# Altium PCB MainBoardPCB_PWR.PcbDoc (part 26 of 29)
Units mm, origin at the board's own origin, x right, y up, seen from the top; angles counter-clockwise.
Board outline 333.63 x 349.38 mm, 16 copper layers (L1, L2 (GND), L3 (Sign), L4 (GND), L5 (Sign), L6 (PWR/GND), L7(PWR/GND), L8 (PWR/GND), L9 (PWR/GND), L10 (PWR/GND), L11 (PWR/GND), L12 (Sign), L13 (GND), L14 (Sign), L15 (GND), L16), stack 2.503 mm thick; 2187 components, 1615 nets, 7987 pads, 1695 vias.
Unrouted connection lines stored in the file: 4757.
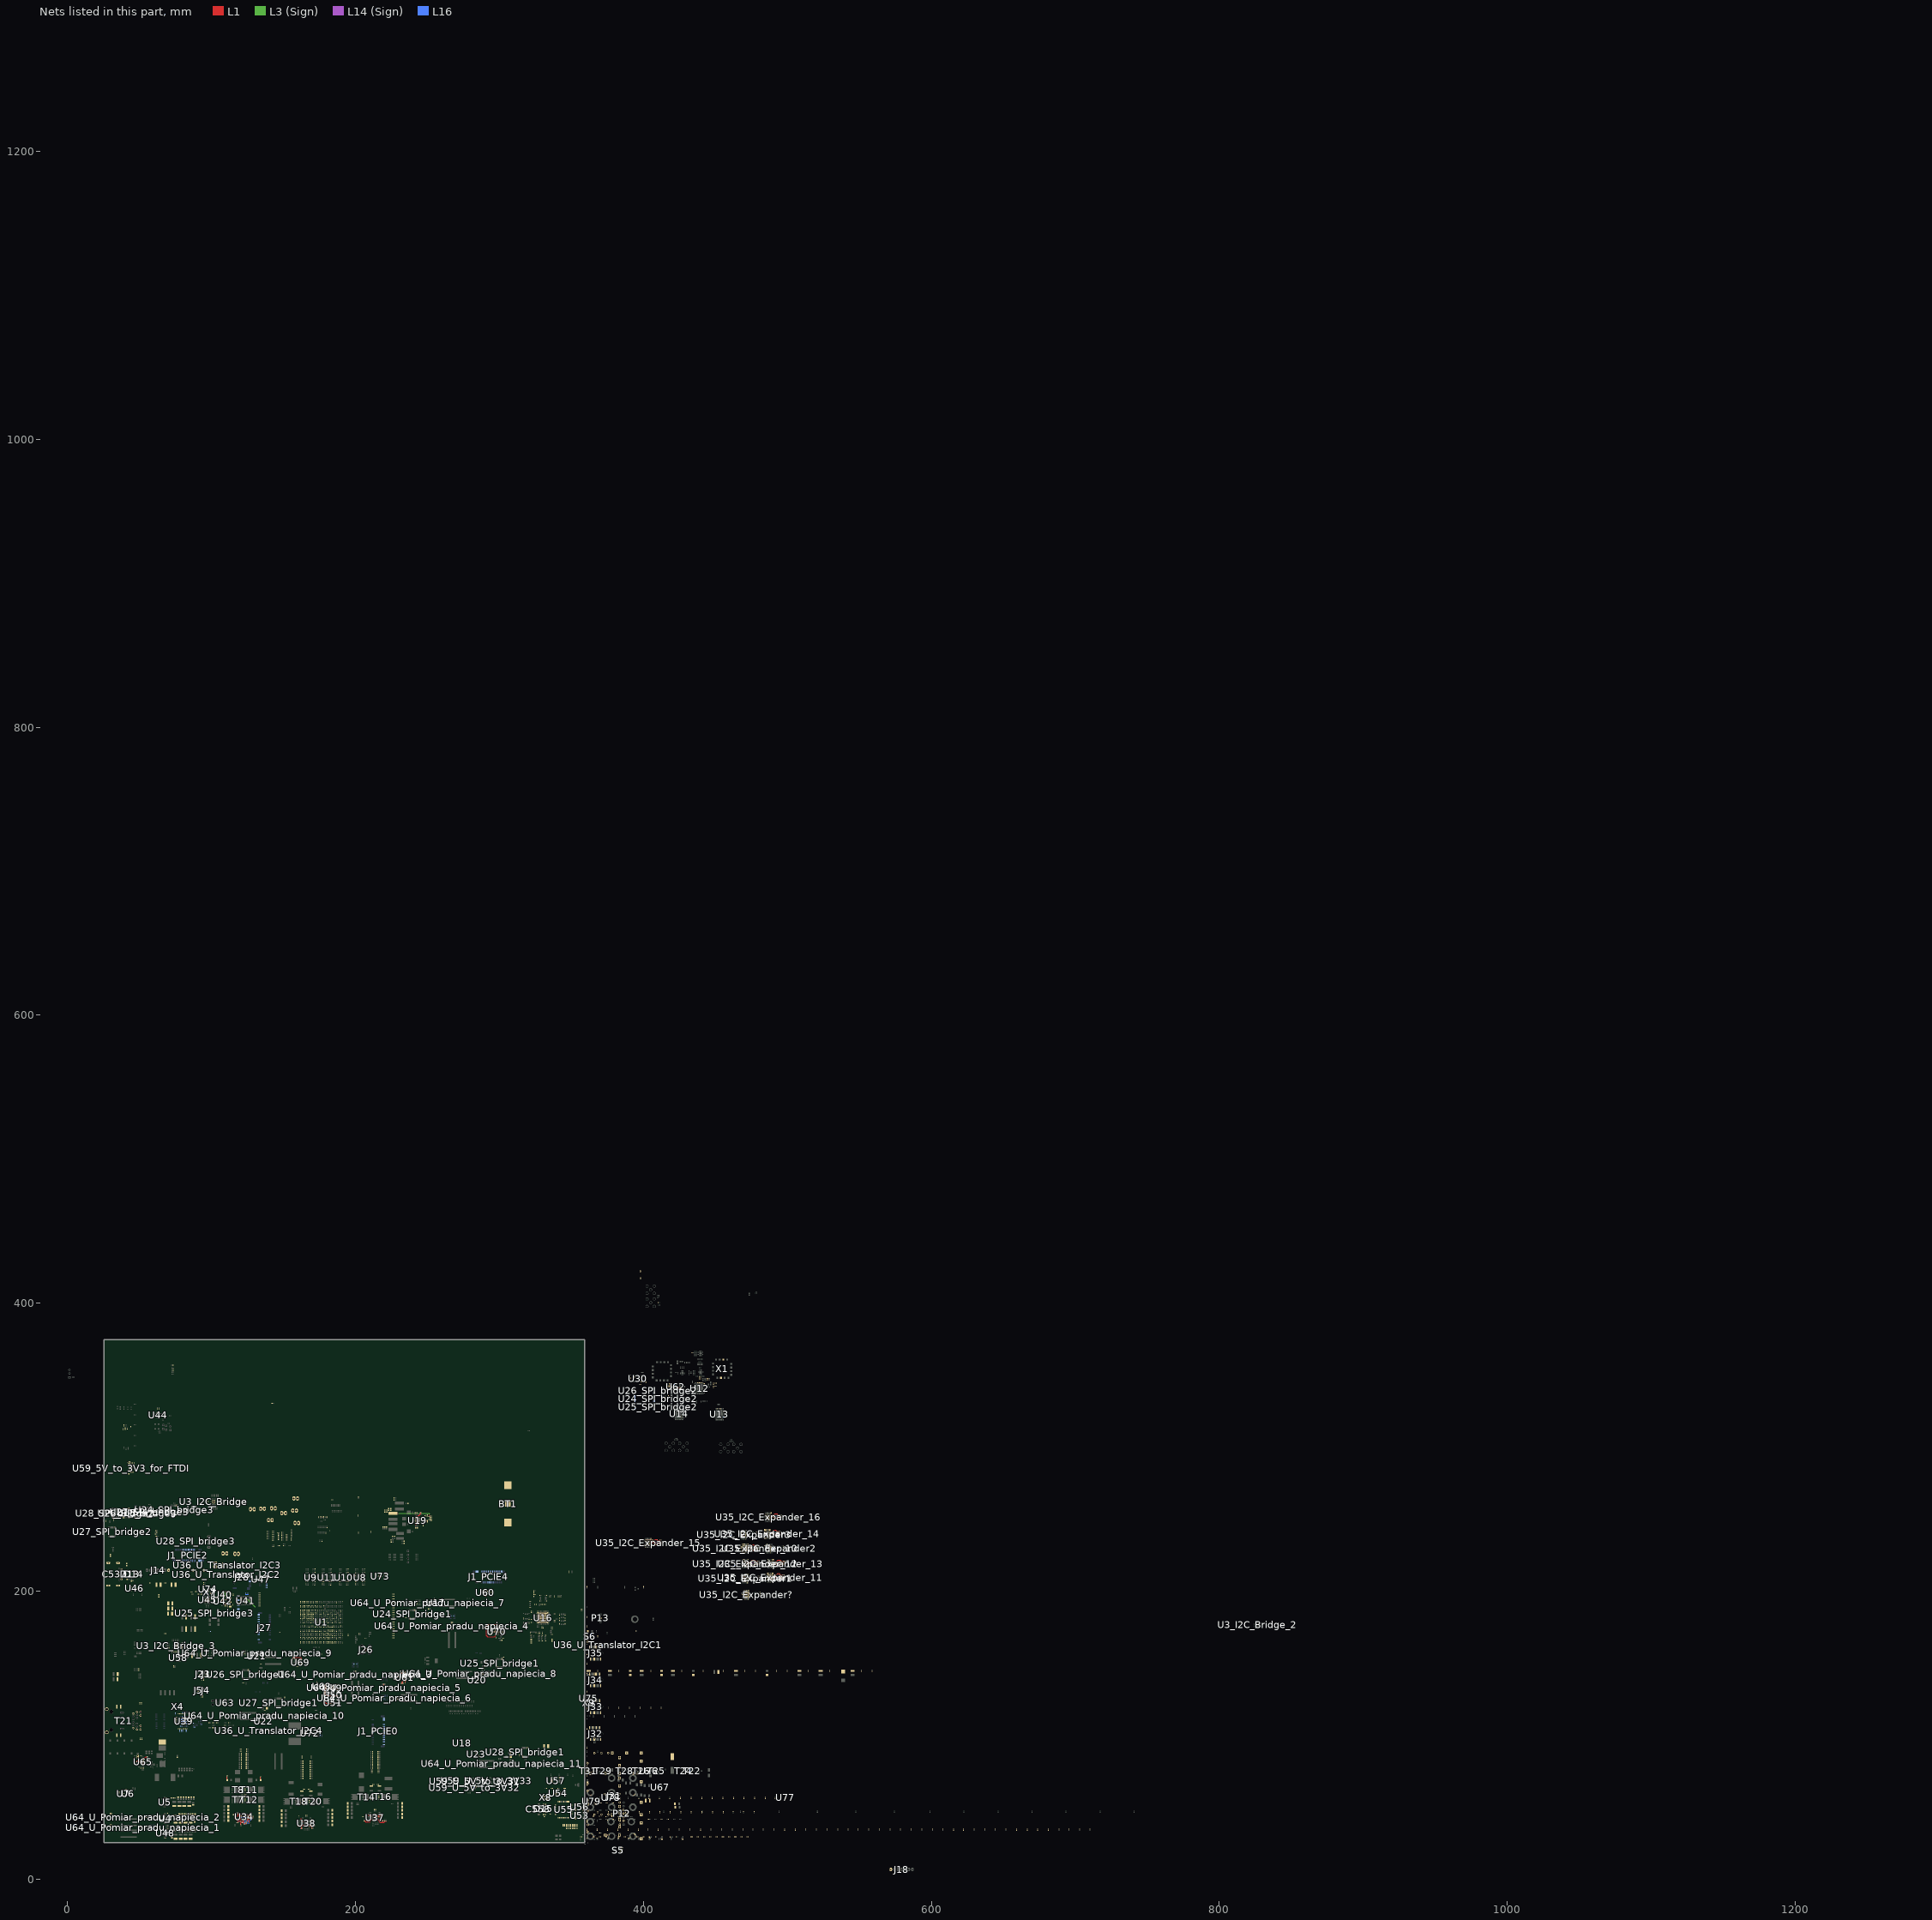
[diagram p21: the nets of this part, all layers, seen from the top]

## Via types
v1: diameter 0.5, hole 0.2, L1 to L16, 786 vias
v2: diameter 0.5/0.35/0.35/0.35/0.35/0.35/0.35/0.35/0.35/0.35/0.35/0.35/0.35/0.35/0.35/0.5 (per signal layer), hole 0.15, L1 to L16, tented both sides, 164 vias
v3: diameter 2.54, hole 1.02, L1 to L16, 152 vias
v4: diameter 0.5/0.35/0.35/0.35/0.35/0.35/0.35/0.35/0.35/0.35/0.35/0.35/0.35/0.35/0.35/0.5 (per signal layer), hole 0.2, L1 to L16, tented both sides, 100 vias
v5: diameter 0.45, hole 0.15, L1 to L16, 79 vias
v6: diameter 0.35/0/0.35 (per signal layer), hole 0.127, L1 to L3 (Sign), tented both sides, 78 vias
v7: diameter 0.45/0.45/0.45/0.45/0.45/0.45/0.45/0.45/0.45/0.45/0.45/0.45/0.45/0.45/0.45/0.45 (per signal layer), hole 0.15, L1 to L16, 65 vias
v8: diameter 0.4, hole 0.15, L1 to L16, 61 vias
v9: diameter 0.2, hole 0.1, L1 to L16, 35 vias
v10: diameter 0.5, hole 0.2, L1 to L16, tented both sides, 32 vias
v11: diameter 0.2/0/0.2 (per signal layer), hole 0.1, L1 to L3 (Sign), 28 vias
v12: diameter 0.4, hole 0.2, L1 to L16, 16 vias
v13: diameter 0.25, hole 0.2, L1 to L16, 16 vias
v14: diameter 0.3, hole 0.2, L1 to L16, 15 vias
v15: diameter 0.5/0.35/0.35/0.35/0.35/0.35/0.35/0.35/0.35/0.35/0.35/0.35/0.35/0.35/0.35/0.45 (per signal layer), hole 0.15, L1 to L16, tented both sides, 10 vias
v16: diameter 5, hole 3, L1 to L16, 9 vias
v17: diameter 0.2/0/0.2 (per signal layer), hole 0.1, L1 to L3 (Sign), tented both sides, 9 vias
v18: diameter 0.35/0/0.35 (per signal layer), hole 0.127, L1 to L3 (Sign), 7 vias
v19: diameter 0.35/0/0.35 (per signal layer), hole 0.127, L14 (Sign) to L16, tented both sides, 5 vias
v20: diameter 1.65, hole 1.65, L1 to L16, 4 vias
v21: diameter 1.15, hole 1.15, L1 to L16, 4 vias
v22: diameter 0.35, hole 0.127, L1 to L2 (GND), 2 vias
v23: diameter 0.4, hole 0.2, L1 to L16, tented both sides, 2 vias
v24: diameter 0.35, hole 0.127, L1 to L2 (GND), tented both sides, 2 vias
v25: diameter 0.508, hole 0.127, L1 to L2 (GND), 2 vias
v26: diameter 0.508, hole 0.127, L2 (GND) to L3 (Sign), 2 vias
v27: diameter 0.35, hole 0.127, L3 (Sign) to L6 (PWR/GND), tented both sides, 2 vias
v28: diameter 0.5, hole 0.2, L3 (Sign) to L6 (PWR/GND), tented both sides, 2 vias
v29: diameter 5.5, hole 3.5, L1 to L16, 1 vias
v30: diameter 0.45/0.45/0.45 (per signal layer), hole 0.15, L1 to L3 (Sign), 1 vias
v31: diameter 0.35/0.35/0.35 (per signal layer), hole 0.127, L1 to L3 (Sign), tented both sides, 1 vias
v32: diameter 0.45/0/0.45 (per signal layer), hole 0.15, L1 to L3 (Sign), tented both sides, 1 vias
v33: diameter 0.45/0/0.45 (per signal layer), hole 0.2, L14 (Sign) to L16, tented both sides, 1 vias
v34: diameter 0.35, hole 0.127, L2 (GND) to L3 (Sign), 1 vias

## Nets (pads, with @x,y where several pads share a name; then routed paths per layer and width w, separated by ;. In a path a pad name is that pad's centre, name@x,y a point inside that pad or via, vN(x,y) a via of type N, cw(c..) or ccw(c..) an arc to the next point about the centre after c; other vN are vias at no path point) (continued)
eMMC_GND: B1.2 BT1.1 C4.2 C5.2 C6.2 C7.2 C8.1 C9.1 C10.1 C11.1 C12.2 C13.2 C14.2 C15.2 C16.1 C17.1 C18.1 C19.1 C20.1 C21.1 C22.1 C23.1 C24.1 C25.1 C26.1 C27.1 C28.1 C29.1 C30.1 C31.1 C32.1 C33.1 C34.1 C35.1 C37.1 C38.2 C39.1 C40.2 C207.1 C208.2 C209.1 C210.2 C211.1 C212.2 C213.1 C214.2 C215.1 C216.2 C217.1 C218.2 C219.2 C220.2 C221.2 C222.2 C223.1 C224.1 C225.1 C226.1 C227.1 C228.1 C229.1 C230.1 C231.1 C232.1 C233.1 C234.1 C235.1 C236.1 C237.1 C238.1 C239.1 C240.1 C241.1 C242.1 C243.2 C244.2 C245.2 C246.2 C247.1 C248.1 C249.1 C250.1 C251.1 C252.1 C253.1 C254.1 C255.1 C256.1 C257.1 C258.1 C259.1 C260.1 C261.1 C262.1 C263.1 C264.1 C265.1 C266.1 C303_I2C_Bridge.1 C303_I2C_Bridge_2.1 C303_I2C_Bridge_3.1 C304.2 C305.2 C306.2 C307.2 C308.1 C309_U_Pomiar_pradu_napiecia_1.1 C309_U_Pomiar_pradu_napiecia_2.1 C309_U_Pomiar_pradu_napiecia_3.1 C309_U_Pomiar_pradu_napiecia_4.1 C309_U_Pomiar_pradu_napiecia_5.1 C309_U_Pomiar_pradu_napiecia_6.1 C309_U_Pomiar_pradu_napiecia_7.1 C309_U_Pomiar_pradu_napiecia_8.1 C309_U_Pomiar_pradu_napiecia_9.1 C309_U_Pomiar_pradu_napiecia_10.1 C309_U_Pomiar_pradu_napiecia_11.1 C310.1 C311_I2C_Expander1.1 C311_I2C_Expander2.1 C311_I2C_Expander3.1 C311_I2C_Expander?.1 C311_I2C_Expander_10.1 C311_I2C_Expander_11.1 C311_I2C_Expander_12.1 C311_I2C_Expander_13.1 C311_I2C_Expander_14.1 C311_I2C_Expander_15.1 C311_I2C_Expander_16.1 C331.1 C332.1 C347.1 C348.1 C352.1 C353.1 C354.1 C355.1 C358.1 C359.1 C360.1 C361.1 C362.1 C363.1 C364.1 C365.1 C366.1 C367.1 C368.1 C369.1 C370.1 C371.1 C372.1 C373.1 C374.1 C375.1 C376.1 C377.1 C378.1 C379.1 C380.1 C381.1 C382.1 C383.1 C384.1 C385.1 C386.1 C387.1 C388.1 C391.2 C392.1 C396.1 C397.2 C399.2 C400.1 C401.1 C402.1 C403.1 C404.1 C405.1 C406.1 C407.1 C408.1 C409.1 C410.1 C411.1 C412.1 C413.1 C414.1 C415.1 C416.1 C417.1 C418.1 C419.1 C420.1 C421.1 C422.1 C423.1 C424.1 C425.1 C426.1 C427.1 C428.1 C429.1 C432.2 C433.1 C437.1 C438.2 C440.2 C441.1 C442.1 C443.1 C444.1 C445.1 C446.1 C447.1 C448.1 C449.1 C450.1 C451.1 C452.1 C453.1 C454.1 C455.1 C456.1 C457.1 C458.1 C459.1 C460.1 C461.1 C462.1 C463.1 C464.1 C465.1 C466.1 C467.1 C468.1 C469.1 C470.1 C471.1 C472.1 C473.1 C474.1 C475.1 C476.1 C480.1 C481.1 C485.1 C486.1 C487.1 C488.1 C489.1 C490.1 C491.1 C492.1 C493.1 C494.1 C495.1 C496.1 C497.1 C498.1 C499.1 C500.1 C501.1 C502.1 C503.1 C504.1 C505.1 C506.1 C507.1 C508.1 C509.1 C510.1 C511.1 C512.1 C513.1 C514.1 C515.1 C516.1 C517.1 C518.1 C519.1 C520.1 C521.1 C522.1 C523.1 C524.1 C537.7 C538.1 C539.1 C544.1 C545.1 C546.1 C547.1 C550.1 C551.1 C552.1 C553.1 C554.1 C555.1 C561.1 C562.1 C585.1 C586.1 C587.1 C606.1 C607.1 C609.1 C610.1 C611.1 C613.1 C614.1 C615.1 C617.1 C618.1 C619.1 C620.1 C621.1 C622.1 C623.1 C624.1 C625.1 C626.1 C631.1 C632.1 C633.1 C636.1 C637.1 C638.1 C645.1 C646.1 C654.1 C655.2 C656.2 C657.2 C672.1 C674.1 C675.1 C676.1 C678.1 C679.1 C680.1 C705.1 C707.1 C708.1 C709.1 C711.1 C712.1 C719.1 C720.1 C721.1 C722.1 C723.1 C728.1 C729.1 C730.1 C731.1 C732.1 C733.1 C734.1 C735.1 C736.1 C737.1 C738.2 C739.2 C740.1 C741.1 C742.2 C743.1 C744.1 C745.1 C746.1 C747.2 C748.1 C749.1 C750.1 C751.2 C752.1 C753.2 C754.1 C755.1 C756.1 C757.2 C758.1 C759.1 C760.2 C761.1 C762.2 C763.1 C764.2 C765.1 C766.2 C767.2 C768.2 C769.2 C770.1 C771.1 C772.1 C773.1 C774.1 C775.1 C776.1 C777.1 C778.1 C779.1 C780.1 C781.1 C782.1 C783.1 C784.1 C785.1 C786.1 C787.1 C788.1 C789.1 C792.1 D13.3 D14.3 D14.8 D15.3 FB27.1 FB28.2 FB29.1 FB35.1 FB36.1 FB39.1 FB41.1 J14.1 J15.1 J16.1 J17.1 J18.1 J19.1 J20.1 J21.1 J22.1 J23.1 J24.1 J27.1 J27.3 J27.9 J27.15 J27.21 J27.27 J27.33 J27.39 J27.45 J27.51 J27.57 J27.63 J27.65 J27.67 J28.6 J31.SH1 J31.SH2 J31.SH3 J31.SH4 J31.SH5 J31.SH6 J31.SH7 J31.SH8 J31.SH9 J31.SH10 J31.SH11 J31.SH12 J31.SH13 J31.SH14 J31.SH15 J31.SH16 J31.SH17 J31.SH18 J31.SH19 J31.SH20 J31.SH21 J31.SH22 J31.SH23 J31.SH24 J31.SH25 J31.SH26 J31.SH27 J31.SH28 J31.SH29 J31.SH30 J31.SH31 J31.SH32 J31.SH33 J31.SH34 J31.SH35 J31.SH36 J31.SH37 J31.SH38 J31.SH39 J31.SH40 J31.SH41 J31.SH42 J31.SH43 J31.SH44 J31.SH45 J31.SH46 J32.1 J32.10 J32.11 J32.14 J32.17 J32.20 J33.1 J33.10 J33.11 J33.14 J33.16 J34.1 J34.10 J34.11 J34.14 J34.16 J35.1 J35.10 J35.11 J35.14 J35.16 P7.1 P9.1 P11.2 P12.2 P12.4 P12.6 P12.8 P12.10 P12.12 P12.14 R2.1 R14.1 R18.1 R19.1 R21.1 R23.1 R25.1 R26.1 R27.1 R28.1 R56.2 R60.2 R61.2 R62.2 R63.2 R64.2 R73.1 R74.1 R109.1 R114.1 R129.2 R139.1 R167.2 R168.2 R170.2 R172.2 R173.2 R174.1 R178.1 R182.1 R183.1 R187.1 R191.1 R192.1 R196.1 R200.1 R201.1 R205.1 R209.1 R210.1 R214.1 R217.1 R218.1 R228.1 R229.1 R242.2 R244.2 R267.1 R269.1 R274.1 R275.1 R279.2 R280.1 R282.2 R284.1 R292.1 R299.1 R304.1 R317.1 R325.1 R326.1 R327.1 R328.1 R334.2 R341.1 R344.1 R345.1 R379.1 R380.1 R393.1 R396.1 R399.1 R400.2 R450.2 R452.2 R454.2 R456.2 R460.2 R461.1 R464.2 R467.1 R470.2 R472.2 R474.2 R476.2 R478.2 R480.2 R493.2 R495.2 R497.2 R501.2 R503.2 R505.2 R509.2 R511.2 R513.2 R517.2 R519.2 R521.2 R525.2 R527.2 R529.2 R561.1 R565.1 R569.1 R573.1 R577.1 R581.1 R585.1 R589.1 R595.1 R601.1 R629.1 R645.1 R652.1 R668.1 R672.1 R674.1 R675.1 R681.1 R682.1 R683.1 R684.1 R685.1 R690.1 R693.2 R696.2 R698.2 R700.2 R702.2 R704.2 R706.2 R708.2 R714.1 R739.2 R741.2 R743.2 R759.2 R761.2 R763.2 R764.1 R838.2 R840.2 R841.2 S6.1 S6.2 T7.1 T7.2 T7.3 T8.1 T8.2 T8.3 T11.1 T11.2 T11.3 T12.1 T12.2 T12.3 T14.1 T14.2 T14.3 T16.1 T16.2 T16.3 T18.1 T18.2 T18.3 T20.1 T20.2 T20.3 T24.2 T25.2 T26.2 T28.2 T29.2 T31.2 U1.A1 U1.A2 U1.A5 U1.A9 U1.A11 U1.A30 U1.AA9 U1.AA19 U1.AA29 U1.AB2 U1.AB7 U1.AB12 U1.AB17 U1.AB22 U1.AC5 U1.AC10 U1.AC20 U1.AD13 U1.AD18 U1.AD23 U1.AE6 U1.AE16 U1.AE21 U1.AF4 U1.AF9 U1.AF19 U1.AF24 U1.AF29 U1.AG2 U1.AG12 U1.AG22 U1.AH5 U1.AH15 U1.AH20 U1.AH25 U1.AJ3 U1.AJ8 U1.AJ13 U1.AJ18 U1.AJ23 U1.AJ28 U1.AK1 U1.AK30 U1.B3 U1.B4 U1.B7 U1.B11 U1.B13 U1.B17 U1.C1 U1.C2 U1.C5 U1.C9 U1.C11 U1.C15 U1.C20 U1.C25 U1.C30 U1.D3 U1.D4 U1.D7 U1.D11 U1.E1 U1.E2 U1.E5 U1.E9 U1.E11 U1.F3 U1.F4 U1.F7 U1.F11 U1.F14 U1.F24 U1.F25 U1.F26 U1.F27 U1.F28 U1.F29 U1.F30 U1.G1 U1.G2 U1.G5 U1.G9 U1.G11 U1.G17 U1.G22 U1.G23 U1.G24 U1.G27 U1.G28 U1.H3 U1.H4 U1.H7 U1.H11 U1.H20 U1.H22 U1.H26 U1.H29 U1.H30 U1.J1 U1.J2 U1.J5 U1.J9 U1.J10 U1.J11 U1.J13 U1.J22 U1.J24 U1.J27 U1.J28 U1.K3 U1.K4 U1.K9 U1.K22 U1.K26 U1.K29 U1.K30 U1.L1 U1.L2 U1.L5 U1.L9 U1.L12 U1.L16 U1.L18 U1.L22 U1.L24 U1.L28 U1.M3 U1.M4 U1.M7 U1.M9 U1.M11 U1.M13 U1.M15 U1.M17 U1.M22 U1.M26 U1.M29 U1.M30 U1.N1 U1.N2 U1.N5 U1.N9 U1.N12 U1.N14 U1.N16 U1.N23 U1.N24 U1.N25 U1.N26 U1.N27 U1.N28 U1.N29 U1.N30 U1.P3 U1.P4 U1.P7 U1.P9 U1.P11 U1.P13 U1.P15 U1.P17 U1.R1 U1.R2 U1.R5 U1.R9 U1.R12 U1.R16 U1.R21 U1.R26 U1.T3 U1.T4 U1.T7 U1.T8 U1.T11 U1.T13 U1.T17 U1.T19 U1.T24 U1.T29 U1.U1 U1.U2 U1.U5 U1.U7 U1.U12 U1.U16 U1.U22 U1.U27 U1.V3 U1.V4 U1.V7 U1.V9 U1.V11 U1.V13 U1.V20 U1.V25 U1.W1 U1.W2 U1.W5 U1.W6 U1.W12 U1.W14 U1.W16 U1.W18 U1.W23 U1.W28 U1.Y2 U1.Y3 U1.Y4 U1.Y5 U1.Y11 U1.Y13 U1.Y15 U1.Y21 U1.Y26 U3_I2C_Bridge.9 U3_I2C_Bridge.25 U3_I2C_Bridge_2.9 U3_I2C_Bridge_2.25 U3_I2C_Bridge_3.9 U3_I2C_Bridge_3.25 U4.3 U4.6 U4.12 U5.3 U5.6 U5.12 U6.A1 U6.A4 U6.B1 U6.B2 U6.B3 U6.B4 U6.C4 U7.A1 U7.A4 U7.B1 U7.B2 U7.B3 U7.B4 U7.C4 U8.A2 U8.A5 U8.B2 U8.C6 U8.D2 U8.D5 U8.E1 U8.E3 U8.E5 U8.E6 U8.F1 U8.G5 U8.H1 U8.H6 U8.K1 U8.K6 U8.M6 U8.N1 U8.T1 U9.A2 U9.A5 U9.B2 U9.C6 U9.D2 U9.D5 U9.E1 U9.E3 U9.E5 U9.E6 U9.F1 U9.G5 U9.H1 U9.H6 U9.K1 U9.K6 U9.M6 U9.N1 U9.T1 U10.A2 U10.A5 U10.B2 U10.C6 U10.D2 U10.D5 U10.E1 U10.E3 U10.E5 U10.E6 U10.F1 U10.G5 U10.H1 U10.H6 U10.K1 U10.K6 U10.M6 U10.N1 U10.T1 U11.A2 U11.A5 U11.B2 U11.C6 U11.D2 U11.D5 U11.E1 U11.E3 U11.E5 U11.E6 U11.F1 U11.G5 U11.H1 U11.H6 U11.K1 U11.K6 U11.M6 U11.N1 U11.T1 U15.2 U15.10 U17.A1 U17.A4 U17.B1 U17.B2 U17.B3 U17.B4 U17.C4 U18.A1 U18.A4 U18.B1 U18.B2 U18.B3 U18.B4 U18.C4 U19.10 U19.18 U19.27 U19.29 U20.A1 U20.A4 U20.B1 U20.B2 U20.B3 U20.B4 U20.C4 U21.A1 U21.A4 U21.B1 U21.B2 U21.B3 U21.B4 U21.C4 U22.A1 U22.A4 U22.B1 U22.B2 U22.B3 U22.B4 U22.C4 U23.A1 U23.A4 U23.B1 U23.B2 U23.B3 U23.B4 U23.C4 U24_SPI_bridge1.2 U24_SPI_bridge1.10 U24_SPI_bridge2.2 U24_SPI_bridge2.10 U24_SPI_bridge3.2 U24_SPI_bridge3.10 U25_SPI_bridge1.2 U25_SPI_bridge1.10 U25_SPI_bridge2.2 U25_SPI_bridge2.10 U25_SPI_bridge3.2 U25_SPI_bridge3.10 U26_SPI_bridge1.2 U26_SPI_bridge1.10 U26_SPI_bridge2.2 U26_SPI_bridge2.10 U26_SPI_bridge3.2 U26_SPI_bridge3.10 U27_SPI_bridge1.2 U27_SPI_bridge1.10 U27_SPI_bridge2.2 U27_SPI_bridge2.10 U27_SPI_bridge3.2 U27_SPI_bridge3.10 U28_SPI_bridge1.2 U28_SPI_bridge1.10 U28_SPI_bridge2.2 U28_SPI_bridge2.10 U28_SPI_bridge3.2 U28_SPI_bridge3.10 U34.19 U34.22 U35_I2C_Expander1.6 U35_I2C_Expander1.29 U35_I2C_Expander2.6 U35_I2C_Expander2.29 U35_I2C_Expander3.6 U35_I2C_Expander3.29 U35_I2C_Expander?.6 U35_I2C_Expander?.29 U35_I2C_Expander_10.6 U35_I2C_Expander_10.29 U35_I2C_Expander_11.6 U35_I2C_Expander_11.29 U35_I2C_Expander_12.6 U35_I2C_Expander_12.29 U35_I2C_Expander_13.6 U35_I2C_Expander_13.29 U35_I2C_Expander_14.6 U35_I2C_Expander_14.29 U35_I2C_Expander_15.6 U35_I2C_Expander_15.29 U35_I2C_Expander_16.6 U35_I2C_Expander_16.29 U36_U_Translator_I2C1.1 U36_U_Translator_I2C2.1 U36_U_Translator_I2C3.1 U36_U_Translator_I2C4.1 U37.19 U37.22 U38.19 U38.22 U39.49 U40.4 U40.9 U41.A6 U41.C4 U41.E7 U41.G5 U41.H10 U41.J5 U41.K8 U41.N2 U41.N5 U41.P4 U41.P6 U42.4 U42.9 U45.23 U45.33 U46.A1 U46.A4 U46.B1 U46.B2 U46.B4 U47.C3 U48.12 U49.4 U49.9 U50.4 U50.9 U51.4 U51.9 U58.2 U58.3 U58.6 U58.7 U63.2 U63.8 U64_U_Pomiar_pradu_napiecia_1.7 U64_U_Pomiar_pradu_napiecia_2.7 U64_U_Pomiar_pradu_napiecia_3.7 U64_U_Pomiar_pradu_napiecia_4.7 U64_U_Pomiar_pradu_napiecia_5.7 U64_U_Pomiar_pradu_napiecia_6.7 U64_U_Pomiar_pradu_napiecia_7.7 U64_U_Pomiar_pradu_napiecia_8.7 U64_U_Pomiar_pradu_napiecia_9.7 U64_U_Pomiar_pradu_napiecia_10.7 U64_U_Pomiar_pradu_napiecia_11.7 U67.2 U68.2 U69.6 U69.17 U70.3 U70.8 U70.13 U70.18 U70.21 U72.7 U73.4 U73.9 U74.3 U75.3 U78.2 X4.2 X4.4 X7.2 X7.4 | length 5.7
  L1 w0.254: U1.AF24@186.927,186.927 v24(186.931,186.923) ; v24(187.924,184.927) U1.AG22@187.927,184.927 ; v22(242.224,246.141) U19.10@242.224,246.658 ; U19.27@242.224,251.458 v18(242.224,252.049) ; v8(295.595,171.723) U70.3@296.284,171.723 v1(297.359,171.723) v1(298.259,171.723)
  L16 w0.254: R577.1@219.302,140.072 R581.1@221.208,140.072
  other v1: 80.087,107.674 81.457,107.674 78.972,108.789 80.087,108.789 81.457,108.789 82.572,108.789 78.972,110.159 80.087,110.159 81.457,110.159 82.572,110.159 80.087,111.274 81.457,111.274 183.759,122.038 184.759,122.038 183.759,123.038 184.759,123.038 183.759,127.285 184.759,127.285 183.759,128.285 184.759,128.285 183.759,132.134 184.759,132.134 183.759,133.134 184.759,133.134 161.168,149.912 162.268,149.912 161.168,151.012 162.268,151.012 297.359,170.823 298.259,170.823 299.159,170.823 299.159,171.723 297.359,172.623 298.259,172.623 299.159,172.623 107.317,192.548 108.317,192.548 107.317,193.548 108.317,193.548 107.316,196.835 108.316,196.835 107.316,197.835 108.316,197.835 469.236,207.067 470.336,207.067 471.436,207.067 472.536,207.067 469.236,208.167 470.336,208.167 471.436,208.167 472.536,208.167 469.236,209.267 470.336,209.267 471.436,209.267 472.536,209.267 216.651,209.883 217.651,209.883 469.236,210.367 470.336,210.367 471.436,210.367 472.536,210.367 216.651,210.883 217.651,210.883 469.12,217.4 470.22,217.4 471.32,217.4 472.42,217.4 469.12,218.5 470.22,218.5 471.32,218.5 472.42,218.5 469.12,219.6 470.22,219.6 471.32,219.6 472.42,219.6 469.12,220.7 470.22,220.7 471.32,220.7 472.42,220.7 485.515,227.915 486.615,227.915 487.715,227.915 488.815,227.915 485.515,229.015 486.615,229.015 487.715,229.015 488.815,229.015 485.515,230.115 486.615,230.115 487.715,230.115 488.815,230.115 485.515,231.215 486.615,231.215 487.715,231.215 488.815,231.215 401.804,231.87 402.904,231.87 404.004,231.87 405.104,231.87 401.804,232.97 402.904,232.97 404.004,232.97 405.104,232.97 401.804,234.07 402.904,234.07 404.004,234.07 405.104,234.07 401.804,235.17 402.904,235.17 404.004,235.17 405.104,235.17 468.195,237.62 469.295,237.62 470.395,237.62 471.495,237.62 468.195,238.72 469.295,238.72 470.395,238.72 471.495,238.72 468.195,239.82 469.295,239.82 470.395,239.82 471.495,239.82 468.195,240.92 469.295,240.92 470.395,240.92 471.495,240.92 242.424,247.958 243.524,247.958 242.424,249.058 243.524,249.058 485.203,249.839 486.303,249.839 487.403,249.839 488.503,249.839 242.424,250.158 243.524,250.158 485.203,250.939 486.303,250.939 487.403,250.939 488.503,250.939 485.203,252.039 486.303,252.039 487.403,252.039 488.503,252.039 485.203,253.139 486.303,253.139 487.403,253.139 488.503,253.139
  other v4: 220.255,140.072 181.927,191.927
  other v5: 66.285,34.081 69.809,35.032 66.285,36.958 69.753,37.017 67.96,38.575 67.56,45.343 67.854,50.161 69.587,56.524 67.512,56.624 292.356,170.033 294.076,170.033
  other v10: 178.927,187.927 180.927,188.927 179.927,190.927
  other v13: 95.498,192.272 96.518,192.272 97.538,192.272 98.558,192.272 95.498,193.292 96.518,193.292 97.538,193.292 98.558,193.292 95.498,194.312 96.518,194.312 97.538,194.312 98.558,194.312 95.498,195.332 96.518,195.332 97.538,195.332 98.558,195.332
  other v14: 75.299,161.107 74.454,161.955 75.299,161.955 76.124,161.955 75.299,162.805 826.389,175.733 825.544,176.581 826.389,176.581 827.214,176.581 826.389,177.431 101.6,261.154 100.755,262.001 101.6,262.001 102.425,262.001 101.6,262.851
eMMC_PG1: R340.1 U40.5 | length 3.6
  L1 w0.164: U40.5@109.116,196.323 U40.5@109.116,196.36 ; v18(109.726,199.669) R340.1@109.776,199.669
  L3 (Sign) w0.164: v18(109.416,196.36) 109.452,196.396 109.665,196.396 109.726,196.456 v18(109.726,199.669)
eMMC_PG2: R343.1 R345.2 U42.5 | length 3.1
  L1 w0.164: U42.5@109.117,192.073 109.242,192.073 109.335,191.98 109.335,191.855 109.572,191.618 R345.2@109.572,190.652 ; R345.2@109.572,190.636 R345.2@109.572,190.652 ; R343.1@110.957,190.652 R345.2@109.572,190.652
eMMC_rst: R99.1 R797.1 U41.K5 | length 10.4
  L1 w0.254: U41.K5@122.468,194.479 v17(122.479,194.479)
  L3 (Sign) w0.098: v17(122.479,194.479) 122.729,194.729 124.47,194.729 130.169,189.031 130.362,189.031
eMMC_Vcc: C517.2 C518.2 C523.2 C586.2 FB25.1 R339.2 R340.2 U40.8 U41.E6 U41.F5 U41.J10 U41.K9
  other v1: 118.164,196.899 119.264,196.899
eMMC_VccQ: C519.2 C520.2 C524.2 C587.2 FB25.2 R342.2 R343.2 U41.C6 U41.M4 U41.N4 U41.P3 U41.P5 U42.8
  other v1: 111.29,188.882 118.249,190.694 119.22,190.694 111.357,193.452 111.357,194.212
eMMC_Vddim: C521.2 C522.2 U41.C2 | length 1.6
  L16 w0.164: C522.2@123.76,197.623 C521.2@125.318,197.623
EN1: U35_I2C_Expander2.23 U61.20
EN1_TPS: R277.2 R278.2 U34.14 U34.27 U70.20 | length 8.3
  L1 w0.254: R278.2@116.439,43.474 116.439,43.524 116.612,43.697 117.019,43.697 117.228,43.906 U34.27@120.477,43.906 ; U34.14@124.977,43.906 124.979,43.904 125.128,43.904 125.132,43.899 126.383,43.899 126.903,43.379 128.704,43.379 R277.2@128.799,43.474
EN2: U35_I2C_Expander2.24 U61.6
EN2_TPS: R745.1 U70.6 U70.17 | length 25
  L1 w0.254: U70.6@297.259,169.748 297.259,168.891 296.591,168.223 291.986,168.223 291.068,169.141 291.068,175.325 292.548,176.805 R745.1@298.259,176.805 298.409,176.655 298.409,176.07 298.399,176.06 298.399,174.709 298.759,174.349 U70.17@298.759,173.698
EN_0.85V_REG1: S5.8 U34.1 U34.8
En_0V85@2A: R296.2 R435.2 U37.14 | length 1.3
  L1 w0.254: U37.14@215.795,43.359 R296.2@217.105,43.359
EN_1V0@1.5A: R634.1 U51.3 U68.4 | length 14.8
  L1 w0.254: U68.4@178.016,132.909 178.266,132.909 178.743,132.432 178.743,123.104 179.628,122.219 R634.1@180.597,122.219 180.6,122.216 182.956,122.216 U51.3@182.959,122.213
EN_1V8@1.5A: R633.1 U50.3 U68.5 | length 10.9
  L1 w0.254: U68.5@178.016,133.859 179.114,133.859 179.263,133.711 179.263,128.084 179.887,127.46 180.564,127.46 R633.1@180.597,127.428 180.613,127.444 182.943,127.444 U50.3@182.959,127.46
EN_2V5@1.5A: R632.1 U49.3 U68.6 | length 6.8
  L1 w0.254: U68.6@178.016,134.809 179.003,134.809 179.803,134.009 179.803,132.644 180.069,132.378 180.424,132.378 R632.1@180.547,132.255 180.601,132.309 U49.3@182.959,132.309
EN_3V3V_REG0: S5.6 U37.1
EN_5V_REG0: S5.7 U38.8
EN_12@8A: S5.5 U38.1
EN_Detect_KEY: R655.2
En_PCIE_I2C: U35_I2C_Expander_14.21
En_PCIE_SPI: U35_I2C_Expander_14.20
EN_PS_LTC6952_1: U35_I2C_Expander2.20 U59_U_5V_to_3V33.3
EN_PS_LTC6952_2: U35_I2C_Expander2.22 U59_U_5V_to_3V32.3
EN_PS_LTC6952_3: U35_I2C_Expander2.17 U59_U_5V_to_3V31.3
En_PWRSwitch_PCIE0: U17.A2 U35_I2C_Expander_14.2
En_PWRSwitch_PCIE1: U20.A2 U35_I2C_Expander_14.18
En_PWRSwitch_PCIE2: U21.A2 U35_I2C_Expander_14.3
En_PWRSwitch_PCIE3: U22.A2 U35_I2C_Expander_14.22
En_PWRSwitch_PCIE4: U23.A2 U35_I2C_Expander_14.19
  other v1: 484.417,237.997 485.517,237.997 486.617,237.997 487.717,237.997 484.417,239.097 485.517,239.097 486.617,239.097 487.717,239.097 484.417,240.197 485.517,240.197 486.617,240.197 487.717,240.197 484.417,241.297 485.517,241.297 486.617,241.297 487.717,241.297
EN_SEQ_LT3504: R646.2 U67.3 U69.5 | length 8.3
  L1 w0.254: R646.2@156.588,153.062 156.588,153.809 156.781,154.002 161.918,154.002 162.693,153.227 U69.5@162.693,152.137
EN_SPI_A_Q0: R232_SPI_bridge3.1 U35_I2C_Expander_10.21
EN_SPI_A_Q1: R234_SPI_bridge3.1 U35_I2C_Expander_10.20
EN_SPI_A_Q2: R235_SPI_bridge3.2 U35_I2C_Expander_10.2
EN_SPI_A_Q3: R237_SPI_bridge3.2 U35_I2C_Expander_10.18
EN_SPI_A_Q4: R239_SPI_bridge3.1 U35_I2C_Expander_10.3
EN_SPI_B_Q0: R232_SPI_bridge1.1 U35_I2C_Expander_10.22 U35_I2C_Expander_15.1
EN_SPI_B_Q1: R234_SPI_bridge1.1 U35_I2C_Expander_10.19 U35_I2C_Expander_15.28
EN_SPI_B_Q2: R235_SPI_bridge1.2 U35_I2C_Expander_10.17 U35_I2C_Expander_15.25
EN_SPI_B_Q3: R237_SPI_bridge1.2 U35_I2C_Expander_10.4 U35_I2C_Expander_15.26
EN_SPI_B_Q4: R239_SPI_bridge1.1 U35_I2C_Expander_10.23 U35_I2C_Expander_15.27
EN_SPI_C_Q0: R232_SPI_bridge2.1 U35_I2C_Expander_10.24
EN_SPI_C_Q1: R234_SPI_bridge2.1 U35_I2C_Expander_10.1
EN_SPI_C_Q2: R235_SPI_bridge2.2 U35_I2C_Expander_10.28
EN_SPI_C_Q3: R237_SPI_bridge2.2 U35_I2C_Expander_10.25
EN_SPI_C_Q4: R239_SPI_bridge2.1 U35_I2C_Expander_10.26
EN_VSUP_1V2: C626.2 R309.1 U19.12
EN_VSUP_1V8: C625.2 R308.1 U19.15
EN_VSUP_3V3: C624.2 R305.1 U19.14
Enable_CLK: U12.40 U13.40 U14.40 U35_I2C_Expander?.25
EXPANDER_RESET: J21.2 P13.2 R811.1 U35_I2C_Expander?.14
Ext_EZS_N: R82.1 U1.AK6 U12.48
Ext_EZS_P: R82.2 U1.AK7 U12.47
FB1/FB2: R271.1 R273.2 U34.10 U34.31 | length 12.3
  L1 w0.254: R271.1@118.246,39.126 118.296,39.126 v1(118.696,39.526) ; R273.2@118.596,41.023 118.713,40.906 v1(119.896,40.906) 119.887,40.915 119.887,41.656 120.135,41.904 120.475,41.904 U34.31@120.477,41.906 ; U34.10@124.977,41.906 124.979,41.904 125.476,41.904 125.752,41.628 v1(125.752,40.904)
  L16 w0.254: v1(118.596,40.898) 118.596,40.859 118.696,40.759 v1(118.696,39.526) ; v1(125.752,40.904) 125.751,40.905 v1@119.897,40.905 ; v1(119.896,40.906) v1@119.897,40.905
FB1_1: R287.1 R290.2 U37.31 | length 7.1
  L1 w0.254: R287.1@205.838,40.414 R290.2@206.788,40.414 206.866,40.336 206.866,39.9 207.015,39.751 210.164,39.751 210.623,40.21 210.623,41.009 210.973,41.359 U37.31@211.295,41.359
FB1_2: R626.1 R627.2 U38.31 | length 3.3
  L1 w0.254: R626.1@162.787,35.058 162.775,35.07 162.775,35.994 R627.2@162.764,36.005 162.922,36.164 162.922,37.314 163.123,37.515 U38.31@163.783,37.515
FB2_1: R297.1 R300.2 U37.10 | length 7.6
  L1 w0.254: U37.10@215.795,41.359 216.376,41.359 216.54,41.196 216.54,39.949 217.073,39.416 219.835,39.416 220.17,39.751 R300.2@220.17,40.315 R297.1@221.201,40.315
FB2_2: R315.1 R318.2 U38.10 | length 3.5
  L1 w0.254: U38.10@168.283,37.515 168.833,37.515 169.006,37.342 169.006,36.445 169.349,36.103 R315.1@169.774,36.103 R318.2@169.774,35.175
Flag_PWRSwitch_PCIE0: R602.2 U17.A3 U35_I2C_Expander_14.4
Flag_PWRSwitch_PCIE1: R603.2 U20.A3 U35_I2C_Expander_14.23
Flag_PWRSwitch_PCIE2: R604.2 U21.A3 U35_I2C_Expander_14.24
Flag_PWRSwitch_PCIE3: R605.2 U22.A3 U35_I2C_Expander_14.1
Flag_PWRSwitch_PCIE4: R606.2 U23.A3 U35_I2C_Expander_14.28
FPGA_Vcc_HD: C605.2 C606.2 C607.2 C610.2 C611.2 C756.2 C759.2 L16.2 R212.2 R365.1 R395.2 R398.2 R618.2 R659.2 R660.2 R661.2 R662.2 R663.2 R664.2 R688.2 R744.2 R817.2 R818.2 R819.2 R820.2 R821.2 R822.2 R823.2 R824.2 U1.AA4 U1.AC15 U1.AD3 U1.AD8 U1.AE11 U1.AF14 U1.AG7 U1.AG17 U1.AH10 U1.D13 U1.E10 U1.E16 U1.G10 U1.G12 U1.H15 U1.H25 U1.K25 U1.L27 U15.1 U15.7 U15.8 U15.16 U36_U_Translator_I2C1.2 U36_U_Translator_I2C4.2 U79.15 | length 27.3
  L1 w0.254: L16.2@225.965,254.051 225.981,254.066 v18(229.614,254.066) ; R212.2@251.788,252.024 v18(251.788,253.026)
  L3 (Sign) w0.254: v18(229.614,254.066) 250.748,254.066 v18(251.788,253.026)
FPGA_Vcc_HP: R363.1 R364.1 R506.1 R507.1 R514.1 R515.1 R522.1 R523.1 R530.1 R531.1 R546.1 R547.1 R548.1 R549.1 R550.1 R551.1 R552.1 R553.1 R554.1 R555.1 R556.1 R557.1 R735.1
FTD_DS_Dir1: R411.2 R412.2 U56.1
FTD_DS_Dir2: R413.2 R414.2 U56.2
FTD_DS_Dir3: R415.2 R416.2 U56.7
FTD_DS_Dir4: R418.2 R421.2 U56.8
FTD_JTAG_Dir1: R402.2 R403.2 U53.1
FTD_JTAG_Dir2: R404.2 R405.2 U53.2
FTD_JTAG_Dir3: R406.2 R407.2 U53.7
FTD_JTAG_Dir4: R408.2 R409.2 U53.8
FTD_U1_DIR1: R722.2 R723.2 U79.1
FTD_U1_DIR2: R724.2 R725.2 U79.2
FTD_U1_DIR3: R726.2 R727.2 U79.7
FTD_U1_DIR4: R728.2 R729.2 U79.8
FTD_U_DIR1: R636.2 R637.2 U57.1
FTD_U_DIR2: R638.2 R639.2 U57.2
FTD_U_DIR3: R640.2 R641.2 U57.7
FTD_U_DIR4: R642.2 R643.2 U57.8
FTDI_5V: C559.2 C560.2 C563_5V_to_3V3_for_FTDI.2 C564_5V_to_3V3_for_FTDI.2 FB31.1 U59_5V_to_3V3_for_FTDI.1 U59_5V_to_3V3_for_FTDI.2 U59_5V_to_3V3_for_FTDI.3
FTDI_DM: C558.2 D15.2 U55.7
FTDI_DP: C558.3 D15.1 U55.8
FTDI_EECLK: R417.2 U54.4 U55.62
FTDI_EECS: R420.2 U54.5 U55.63
FTDI_EED: R419.1 U54.3 U55.61
FTDI_GND: C559.1 C560.1 C563_5V_to_3V3_for_FTDI.1 C564_5V_to_3V3_for_FTDI.1 C565_5V_to_3V3_for_FTDI.1 C566_5V_to_3V3_for_FTDI.1 C567_5V_to_3V3_for_FTDI.1 C658.1 C659.1 C660.1 C661.1 C662.1 C663.1 C664.1 C665.1 C666.1 C667.1 C668.1 C669.1 C670.1 C671.1 C673.1 C791.1 FB32.1 R403.1 R405.1 R407.1 R409.1 R412.1 R414.1 R416.1 R421.1 R423.1 R432_5V_to_3V3_for_FTDI.1 R637.1 R639.1 R641.1 R643.1 R723.1 R725.1 R727.1 R729.1 U53.10 U54.2 U55.1 U55.5 U55.10 U55.11 U55.13 U55.15 U55.25 U55.35 U55.47 U55.51 U56.10 U57.10 U59_5V_to_3V3_for_FTDI.4 U59_5V_to_3V3_for_FTDI.9 U77.2 U79.10 X8.2 X8.4
  other v1: 43.576,284.84 44.576,284.84 43.576,285.84 44.576,285.84
  other v5: 44.222,289.442 41.72,289.909
FTDI_JTAG_ON: U55.21
FTDI_JTAG_ON_1: R401.1 U53.9
FTDI_JTAG_ON_2: R410.1 U56.9
FTDI_JTAG_ON_3: R635.1 U57.9
FTDI_JTAG_ON_4: R721.1 U79.9
FTDI_LS_UART0_RXD: U55.27 U79.4
FTDI_LS_UART0_TXD: U55.26 U79.3
FTDI_LS_UART2_CTS_B: U55.41
FTDI_LS_UART2_RTS_B: U55.40
FTDI_LS_UART2_RXD: U55.39 U57.6
FTDI_LS_UART2_TXD: U55.38 U57.5
FTDI_LS_UART_RXD: U55.52 U57.4
FTDI_LS_UART_TXD: U55.48 U57.3
FTDI_PS_POR: U55.23 U77.1
FTDI_PS_SRST+B: U55.24 U77.3
FTDI_Sock_GND: C558.5 FB32.2
FTDI_TCK: P12.5 R732.1 U53.5 U55.16 U56.5
FTDI_TDI: P12.9 R734.1 U53.3 U55.17 U56.3
FTDI_TDO: P12.7 R733.1 U53.6 U55.18 U56.6
FTDI_TMS: P12.3 R731.1 U53.4 U55.19 U56.4
FTDI_VBUS: C558.1 FB31.2
FTDI_VCC1P8: C665.2 C666.2 C667.2 C673.2 U55.12 U55.37 U55.49 U55.64
FTDI_VccIO: C565_5V_to_3V3_for_FTDI.2 C566_5V_to_3V3_for_FTDI.2 C567_5V_to_3V3_for_FTDI.2 C658.2 C668.2 C669.2 C670.2 C671.2 C791.2 FB43.1 FB44.1 R401.2 R402.1 R404.1 R406.1 R408.1 R410.2 R411.1 R413.1 R415.1 R417.1 R418.1 R420.1 R422.2 R424.1 R430_5V_to_3V3_for_FTDI.2 R431_5V_to_3V3_for_FTDI.2 R635.2 R636.1 R638.1 R640.1 R642.1 R721.2 R722.1 R724.1 R726.1 R728.1 U53.16 U54.6 U55.20 U55.31 U55.42 U55.50 U55.56 U56.16 U57.16 U59_5V_to_3V3_for_FTDI.8 U77.5 U79.16
FTDI_X_IN: C663.2 U55.2 X8.1
FTDI_X_OUT: C664.2 U55.3 X8.3
GEM3_MDC: R815.1 U39.16
GEM3_MDIO: R333.2 R816.1 U39.17
GND_PCIe_PCIE0: C1_PCIE0.1 C2_PCIE0.1 C3_PCIE0.1 J1_PCIE0.1 J1_PCIE0.3 J1_PCIE0.9 J1_PCIE0.15 J1_PCIE0.21 J1_PCIE0.24 J1_PCIE0.27 J1_PCIE0.30 J1_PCIE0.33 J1_PCIE0.34 J1_PCIE0.38 J1_PCIE0.39 J1_PCIE0.42 J1_PCIE0.45 J1_PCIE0.48 J1_PCIE0.51 J1_PCIE0.54 J1_PCIE0.57 J1_PCIE0.59 J1_PCIE0.61 J1_PCIE0.63 J1_PCIE0.65 J1_PCIE0.67
GND_PCIe_PCIE1: C1_PCIE1.1 C2_PCIE1.1 C3_PCIE1.1
GND_PCIe_PCIE2: C1_PCIE2.1 C2_PCIE2.1 C3_PCIE2.1 J1_PCIE2.1 J1_PCIE2.3 J1_PCIE2.9 J1_PCIE2.15 J1_PCIE2.21 J1_PCIE2.24 J1_PCIE2.27 J1_PCIE2.30 J1_PCIE2.33 J1_PCIE2.34 J1_PCIE2.38 J1_PCIE2.39 J1_PCIE2.42 J1_PCIE2.45 J1_PCIE2.48 J1_PCIE2.51 J1_PCIE2.54 J1_PCIE2.57 J1_PCIE2.59 J1_PCIE2.61 J1_PCIE2.63 J1_PCIE2.65 J1_PCIE2.67
GND_PCIe_PCIE3: C1_PCIE3.1 C2_PCIE3.1 C3_PCIE3.1
GND_PCIe_PCIE4: C1_PCIE4.1 C2_PCIE4.1 C3_PCIE4.1 J1_PCIE4.1 J1_PCIE4.3 J1_PCIE4.9 J1_PCIE4.15 J1_PCIE4.21 J1_PCIE4.24 J1_PCIE4.27 J1_PCIE4.30 J1_PCIE4.33 J1_PCIE4.34 J1_PCIE4.38 J1_PCIE4.39 J1_PCIE4.42 J1_PCIE4.45 J1_PCIE4.48 J1_PCIE4.51 J1_PCIE4.54 J1_PCIE4.57 J1_PCIE4.59 J1_PCIE4.61 J1_PCIE4.63 J1_PCIE4.65 J1_PCIE4.67
GPIO_ETH_EXPANDER: R715.1 U35_I2C_Expander_13.21 U76.2
GPIO_Exp0_Adress0: R492.1 R493.1 U35_I2C_Expander_11.13 | length 7.2
  L1 w0.254: 491.004,209.461 491.779,209.461 493.186,208.055 494.586,208.055 494.838,208.307 R492.1@494.838,209.018 494.841,209.021 496.081,209.021 496.084,209.024 R493.1@496.834,209.024
GPIO_Exp0_Adress1: R494.1 R495.1 U35_I2C_Expander_11.12 | length 8
  L1 w0.254: U35_I2C_Expander_11.12@491.004,210.111 491.011,210.117 v1(492.63,210.117) ; v1@495.901,210.12 494.842,210.12 R494.1@494.838,210.124 495.901,210.124 v1(495.903,210.122) ; v1@495.902,210.119 496.831,210.119 R495.1@496.833,210.117
  L14 (Sign) w0.254: v1(492.63,210.117) 495.898,210.117 v1(495.903,210.122)
GPIO_Exp0_Adress2: R496.1 R497.1 U35_I2C_Expander_11.11 | length 7.3
  L1 w0.254: 491.004,210.761 491.745,210.761 491.779,210.727 493.388,212.336 494.247,212.336 494.728,211.855 494.728,211.327 R496.1@494.838,211.217 R497.1@496.833,211.217
GPIO_Exp0_Int0: R661.1 U1.AA6 U35_I2C_Expander_11.16
GPIO_Exp0_Int1: R662.1 U1.AA5 U35_I2C_Expander_11.15
GPIO_Exp1_Adress0: R500.1 R501.1 U35_I2C_Expander_12.13 | length 6.7
  L1 w0.254: 473.645,219.05 474.331,219.05 475.481,217.9 477.065,217.9 477.365,218.2 477.365,218.597 R500.1@477.415,218.647 479.302,218.647 R501.1@479.304,218.65
GPIO_Exp1_Adress1: R502.1 R503.1 U35_I2C_Expander_12.12 | length 6.6
  L1 w0.254: U35_I2C_Expander_12.12@473.645,219.7 v1(475.264,219.7) ; R502.1@477.415,219.7 477.448,219.666 v1(478.306,219.666) 478.324,219.684 479.287,219.684 R503.1@479.304,219.702
  L14 (Sign) w0.254: v1(475.264,219.7) 475.297,219.666 v1(478.306,219.666)
GPIO_Exp1_Adress2: R504.1 R505.1 U35_I2C_Expander_12.11 | length 6.8
  L1 w0.254: 473.645,220.35 474.281,220.35 475.481,221.55 477.065,221.55 477.415,221.2 R504.1@477.415,220.747 479.302,220.747 R505.1@479.304,220.75
GPIO_Exp1_Int0: R663.1 U1.AD2 U35_I2C_Expander_12.16
GPIO_Exp1_Int1: R664.1 U1.AE2 U35_I2C_Expander_12.15
GPIO_Exp2_Adress0: R508.1 R509.1 U35_I2C_Expander_13.13 | length 7.3
  L1 w0.254: 491.292,219.05 492.343,219.05 493.537,217.856 495.129,217.856 495.279,218.006 R508.1@495.279,218.656 R509.1@497.372,218.656
GPIO_Exp2_Adress1: R510.1 R511.1 U35_I2C_Expander_13.12 | length 8.5
  L1 w0.254: U35_I2C_Expander_13.12@491.292,219.7 491.308,219.683 v1(493.079,219.683) ; R511.1@497.372,219.7 497.37,219.698 496.481,219.698 v1(496.479,219.695) ; v1(496.479,219.695) 496.475,219.691 495.287,219.691 R510.1@495.279,219.683 495.292,219.695 v1(496.479,219.695)
  L14 (Sign) w0.254: v1(493.079,219.683) 493.092,219.695 v1(496.479,219.695)
GPIO_Exp2_Adress2: R512.1 R513.1 U35_I2C_Expander_13.11 | length 7.2
  L1 w0.254: 491.292,220.35 492.343,220.35 493.543,221.55 494.921,221.55 495.28,221.191 R512.1@495.28,220.7 R513.1@497.372,220.7
GPIO_Exp2_Int0: R688.1 U1.AD1 U35_I2C_Expander_13.16
  other v1: 486.767,217.4 487.867,217.4 488.967,217.4 490.067,217.4 486.767,218.5 487.867,218.5 488.967,218.5 490.067,218.5 486.767,219.6 487.867,219.6 488.967,219.6 490.067,219.6 486.767,220.7 487.867,220.7 488.967,220.7 490.067,220.7
GPIO_Exp2_Int1: R744.1 U1.AE1 U35_I2C_Expander_13.15
GPIO_Exp3_Adress0: R516.1 R517.1 U35_I2C_Expander_14.13 | length 6.3
  L1 w0.254: U35_I2C_Expander_14.13@488.942,240.947 489.527,240.947 490.897,242.317 491.957,242.317 492.306,241.968 492.306,241.562 R516.1@492.377,241.49 R517.1@494.096,241.491
GPIO_Exp3_Adress1: R518.1 R519.1 U35_I2C_Expander_14.12 | length 6
  L1 w0.254: U35_I2C_Expander_14.12@488.942,240.297 488.99,240.345 489.015,240.32 v1(490.444,240.32) ; R518.1@492.377,240.386 v1(493.156,240.386) R519.1@494.096,240.386
  L14 (Sign) w0.254: v1(490.444,240.32) 492.353,240.32 492.377,240.345 ; 492.361,240.386 v1(493.156,240.386)
GPIO_Exp3_Adress2: R520.1 R521.1 U35_I2C_Expander_14.11 | length 6.2
  L1 w0.254: U35_I2C_Expander_14.11@488.942,239.647 489.846,239.647 490.996,238.497 492.106,238.497 492.379,238.769 R520.1@492.379,239.273 R521.1@494.098,239.273
GPIO_Exp3_Int0: R817.1 U1.AC3 U35_I2C_Expander_14.16
GPIO_Exp3_Int1: R818.1 U1.AC2 U35_I2C_Expander_14.15
GPIO_Exp4_Adress0: R524.1 R525.1 U35_I2C_Expander_15.13 | length 6.3
  L1 w0.254: 406.329,233.52 407.257,233.52 407.67,233.107 408.407,232.37 409.572,232.37 409.722,232.52 R524.1@409.722,233.02 ; R524.1@409.572,233.02 R525.1@411.481,233.02
GPIO_Exp4_Adress1: R526.1 R527.1 U35_I2C_Expander_15.12 | length 5.4
  L1 w0.254: U35_I2C_Expander_15.12@406.329,234.17 v1(407.484,234.17) ; v1@410.349,234.17 R527.1@411.481,234.17
  L14 (Sign) w0.254: v1(407.484,234.17) v1(410.562,234.17)
GPIO_Exp4_Adress2: R528.1 R529.1 U35_I2C_Expander_15.11 | length 6
  L1 w0.254: 406.329,234.82 407.257,234.82 407.67,235.233 408.415,235.977 409.574,235.977 409.722,235.829 R528.1@409.722,235.364 ; R528.1@409.847,235.364 R529.1@411.481,235.364
GPIO_Exp4_Int0: R819.1 U1.AA3 U35_I2C_Expander_15.16
GPIO_Exp4_Int1: R820.1 U1.AB3 U35_I2C_Expander_15.15
GPIO_Exp5_Adress0: R697.1 R698.1 U35_I2C_Expander_10.13 | length 6.5
  L1 w0.254: 473.645,229.715 474.631,229.715 475.825,228.521 476.929,228.521 477.129,228.721 R697.1@477.129,229.356 R698.1@478.98,229.356
GPIO_Exp5_Adress1: R699.1 R700.1 U35_I2C_Expander_10.12 | length 6.3
  L1 w0.254: U35_I2C_Expander_10.12@473.645,230.365 473.648,230.362 v1(474.964,230.362) ; R699.1@477.129,230.362 v1(478.11,230.362) R700.1@478.98,230.362
  L14 (Sign) w0.254: v1(474.964,230.362) v1(478.11,230.362)
GPIO_Exp5_Adress2: R701.1 R702.1 U35_I2C_Expander_10.11 | length 6.5
  L1 w0.254: 473.645,231.015 474.629,231.015 475.879,232.265 476.738,232.265 477.129,231.874 R701.1@477.129,231.39 R702.1@478.98,231.39
GPIO_Exp5_Int0: R821.1 U1.AB1 U35_I2C_Expander_10.16
GPIO_Exp5_Int1: R822.1 U1.AC1 U35_I2C_Expander_10.15
GPIO_Exp6_Adress0: R703.1 R704.1 U35_I2C_Expander_16.13 | length 5.8
  L1 w0.254: 489.728,251.489 490.632,251.489 491.475,250.647 492.765,250.647 492.956,250.838 R703.1@492.956,251.174 R704.1@494.769,251.174
GPIO_Exp6_Adress1: R705.1 R706.1 U35_I2C_Expander_16.12 | length 5.9
  L1 w0.254: U35_I2C_Expander_16.12@489.728,252.139 v1(490.925,252.139) ; R705.1@492.956,252.139 v1(493.858,252.139) R706.1@494.769,252.139
  L14 (Sign) w0.254: v1(490.925,252.139) v1(493.858,252.139)
GPIO_Exp6_Adress2: R707.1 R708.1 U35_I2C_Expander_16.11 | length 5.9
  L1 w0.254: 489.728,252.789 490.503,252.789 491.385,253.672 492.807,253.672 492.956,253.523 R707.1@492.956,253.124 R708.1@494.769,253.124
GPIO_Exp6_Int0: R823.1 U1.AA2 U35_I2C_Expander_16.16
GPIO_Exp6_Int1: R824.1 U1.AA1 U35_I2C_Expander_16.15
GPIO_Exp_Reset0: R746.1 U35_I2C_Expander?.21 U35_I2C_Expander_11.14
GPIO_Exp_Reset1: R747.1 U35_I2C_Expander?.20 U35_I2C_Expander_12.14
GPIO_Exp_Reset1.SCL: R559_I2C_Bridge_2.1 U3_I2C_Bridge_2.2 U35_I2C_Expander_10.8 U35_I2C_Expander_11.8 U35_I2C_Expander_12.8 U35_I2C_Expander_13.8
GPIO_Exp_Reset1.SDA: R560_I2C_Bridge_2.1 U3_I2C_Bridge_2.1 U35_I2C_Expander_10.9 U35_I2C_Expander_11.9 U35_I2C_Expander_12.9 U35_I2C_Expander_13.9
GPIO_Exp_Reset2: R748.1 U35_I2C_Expander?.2 U35_I2C_Expander_13.14
GPIO_Exp_Reset3: R749.1 U35_I2C_Expander?.18 U35_I2C_Expander_14.14
GPIO_Exp_Reset4: R750.1 U35_I2C_Expander?.3 U35_I2C_Expander_15.14
GPIO_Exp_Reset5: R751.1 U35_I2C_Expander?.22 U35_I2C_Expander_10.14
GPIO_Exp_Reset6: R752.1 U35_I2C_Expander?.19 U35_I2C_Expander_16.14
Ground: C63.2 C64.2 C67.2 C70.2 C75.2 C76.2 C77.2 C78.1 C79.1 C80.1 C81.2 C82.2 C83.2 C88.2 C89.2 C90.2 C91.2 C92.2 C93.2 C96.2 C99.1 C100.1 C101.1 C102.1 C103.1 C104.1 C105.1 C106.1 C107.1 C108.1 C109.1 C110.1 C124.1 C125.1 C126.1 C127.1 C141.1 C142.1 C143.1 C144.1 C145.1 C146.1 C147.1 C148.1 C162.1 C163.1 C164.1 C165.1 C179.1 C180.1 C572.1 C574.1 C575.1 C576.1 C578.1 C579.1 C590.1 C591.1 C592.1 FB36.2 R437.1 R439.1 R545.1 U16.44 U16.65 U61.3 U61.8 U61.13 U61.18 U61.21 X9.2
  other v1: 233.292,139.105 234.192,139.105 235.092,139.105 233.292,140.005 234.192,140.005 235.092,140.005 233.292,140.905 234.192,140.905 235.092,140.905 327.823,177.914 329.013,177.914 330.203,177.914 331.393,177.914 332.583,177.914 326.603,179.134 327.823,179.134 329.013,179.134 330.203,179.134 331.393,179.134 332.583,179.134 333.803,179.134 326.603,180.324 327.823,180.324 329.013,180.324 330.203,180.324 331.393,180.324 332.583,180.324 333.803,180.324 326.603,181.514 327.823,181.514 329.013,181.514 330.203,181.514 331.393,181.514 332.583,181.514 333.803,181.514 326.603,182.704 327.823,182.704 329.013,182.704 330.203,182.704 331.393,182.704 332.583,182.704 333.803,182.704 326.603,183.894 327.823,183.894 329.013,183.894 330.203,183.894 331.393,183.894 332.583,183.894 333.803,183.894 327.823,185.114 329.013,185.114 330.203,185.114 331.393,185.114 332.583,185.114
Ground_PWR_PoE: C702.1 C703.1 C704.1 D27.2 R159.1 R160.1 R667.1 R670.2 U65.3 U65.8 U65.21 | length 3.7
  L1 w0.254: U65.3@50.492,81.207 U65.21@52.332,81.207 U65.8@52.332,79.367
  other v1: 51.782,80.657 52.882,80.657 51.782,81.757 52.882,81.757
  other v5: 48.16,79.421 48.733,84.301 46.685,84.389 48.733,85.557
HI_Speed_En_PCIE0: U35_I2C_Expander_11.3
HI_Speed_En_PCIE1: U35_I2C_Expander_11.4
HI_Speed_En_PCIE2: U35_I2C_Expander_11.28
HI_Speed_En_PCIE3: U35_I2C_Expander_12.20
HI_Speed_En_PCIE4: U35_I2C_Expander_12.19
HI_Speed_PWR_En: U35_I2C_Expander_11.21
HI_Speed_PWR_En_I2C: U35_I2C_Expander_11.2
HI_Speed_PWR_En_SPI: U35_I2C_Expander_11.18
HI_Speed_PWR_nRST: U35_I2C_Expander_11.20
HW_Conf_05028: R128.1 R129.1 U16.64
I2C0_En: 
I2C0_Reset: 
I2C0Master_SCL: J12.1 R85.1 R774.1 U36_U_Translator_I2C3.3
I2C0Master_SDA: J12.2 R86.1 R775.1 U36_U_Translator_I2C3.4
I2C1_En: U35_I2C_Expander1.19
I2C1_Reset: U35_I2C_Expander1.17
I2C1Master_SCL: J13.1 R83.1 R772.1 U36_U_Translator_I2C2.3
I2C1Master_SDA: J13.2 R84.1 R773.1 U36_U_Translator_I2C2.4
I2C_05028_SCL: R130.2 R132.1 U16.36
I2C_05028_SDA: R131.2 R134.1 U16.35
I2C_SCL_SFP0: J32.5 R559_I2C_Bridge_3.1 U3_I2C_Bridge_3.2
I2C_SCL_SFP1: J33.5 R227_I2C_Bridge_3.1 U3_I2C_Bridge_3.4
I2C_SCL_SFP2: J34.5 R225_I2C_Bridge_3.1 U3_I2C_Bridge_3.6
I2C_SCL_SFP3: J35.5 R223_I2C_Bridge_3.1 U3_I2C_Bridge_3.8
I2C_SDA_SFP0: J32.4 R560_I2C_Bridge_3.1 U3_I2C_Bridge_3.1
I2C_SDA_SFP1: J33.4 R558_I2C_Bridge_3.1 U3_I2C_Bridge_3.3
I2C_SDA_SFP2: J34.4 R226_I2C_Bridge_3.1 U3_I2C_Bridge_3.5
I2C_SDA_SFP3: J35.4 R224_I2C_Bridge_3.1 U3_I2C_Bridge_3.7
I2CFPGA_Master_SCL: R363.2 U1.AG1 U36_U_Translator_I2C1.3 U36_U_Translator_I2C4.3
I2CFPGA_Master_SDA: R364.2 U1.AF3 U36_U_Translator_I2C1.4 U36_U_Translator_I2C4.4
ILIM1: C345.2 R610.1 U34.26 | length 3.2
  L1 w0.254: R610.1@118.546,45.463 118.486,45.403 118.486,44.464 118.427,44.405 U34.26@120.477,44.405
ILIM1_1: C389.2 R619.1 U37.26 | length 2.6
  L1 w0.254: C389.2@208.951,44.41 R619.1@209.916,44.41 209.916,44.36 210.089,44.187 210.139,44.187 210.466,43.859 U37.26@211.295,43.859
ILIM1_2: C430.2 R625.2 U38.26 | length 3
  L1 w0.254: R625.2@162.268,42.063 162.258,42.053 162.258,41.035 163.278,40.015 U38.26@163.783,40.015
ILIM2: C349.2 R611.1 U34.15 | length 3.5
  L1 w0.254: U34.15@124.977,44.406 125.826,44.406 125.833,44.399 126.458,45.025 126.896,45.025 R611.1@127.049,45.178 ; C349.2@127.029,44.139 127.049,44.159 R611.1@127.049,45.178 ; R611.1@127.069,45.198 R611.1@127.049,45.178
ILIM2_1: C393.2 R620.1 U37.15 | length 2.5
  L1 w0.254: U37.15@215.795,43.859 U37.15@215.795,43.859 215.943,43.861 216.491,44.41 R620.1@217.055,44.41 C393.2@218.055,44.409
ILIM2_2: C434.2 R302.2 U38.15 | length 2.6
  L1 w0.254: U38.15@168.283,40.015 168.285,40.017 168.658,40.017 169.281,40.64 C434.2@169.734,40.64 169.734,41.467 R302.2@169.684,41.515 R302.2@169.684,41.515
IMU_INT1: R426.1 R530.2 U1.AD11 U58.4
IMU_INT2: R425.1 R531.2 U1.AD10 U58.9
InSel_05028_00: U16.20
InSel_05028_01: U16.17
InSel_05028_10: U16.28
InSel_05028_11: U16.29
INTA_EXP_MAIN: U1.AE3 U35_I2C_Expander?.16
INTB_EXP_MAIN: U1.Y1 U35_I2C_Expander?.15
Interrupt0: R506.2 U1.AC12 U64_U_Pomiar_pradu_napiecia_3.3
Interrupt1: R507.2 U1.AD12 U64_U_Pomiar_pradu_napiecia_4.3
Interrupt2: R514.2 U1.AA12 U64_U_Pomiar_pradu_napiecia_5.3 | length 1.2
  L1 w0.164: v10(219.703,134.035) 219.703,135.12 U64_U_Pomiar_pradu_napiecia_5.3@219.753,135.17
Interrupt3: R515.2 U1.AA11 U64_U_Pomiar_pradu_napiecia_6.3
Interrupt4: R522.2 U1.AB11 U35_I2C_Expander1.16
Interrupt5: R523.2 U1.AC11 U72.3
Interrupt8: R546.2 U1.AB10 U35_I2C_Expander3.16
Interrupt9: R547.2 U1.AB9 U35_I2C_Expander3.15
Interrupt10: R548.2 U1.Y10
Interrupt11: R549.2 U1.AA10 U35_I2C_Expander1.23 U64_U_Pomiar_pradu_napiecia_1.3
Interrupt12: R550.2 U1.AC9 U35_I2C_Expander1.24 U64_U_Pomiar_pradu_napiecia_2.3
Interrupt13: R551.2 U1.AD9 U35_I2C_Expander1.15
Interrupt14: R552.2 U1.AC6
Interrupt15: R553.2 U1.AD6
Interrupt16: R554.2 U1.W8 U64_U_Pomiar_pradu_napiecia_7.3
Interrupt17: R555.2 U1.Y8 U64_U_Pomiar_pradu_napiecia_8.3
Interrupt18: R556.2 U1.Y7 U64_U_Pomiar_pradu_napiecia_9.3
Interrupt19: R557.2 U1.AA7 U64_U_Pomiar_pradu_napiecia_10.3
Interrupt20: R735.2 U1.AD5 U64_U_Pomiar_pradu_napiecia_11.3
LED_0: R329.1 U39.47
LED_0_RJ: R329.2 T21.17
LED_1: R330.1 U39.46
LED_1_RJ: R330.2 T21.18
LED_2: R331.1 U39.45
LED_2_RJ: R331.2 T21.19
LED_3: R332.2 U39.39
LED_3_RJ: R332.1 T21.20
Logic_Out_KEY: R649.2 T26.3
LTC6952_1_CP_Out: C46.2 R77.2 U12.43 X1.2
LTC6952_1_REF_N: C53.1 R81.2 U12.46
LTC6952_1_REF_P: C54.1 R81.1 U12.45
LTC6952_1_Temp: R607.2 U12.49
LTC6952_1_VCO_N: C334.2 R532.2 U12.38
LTC6952_1_VCO_P: R533.1 U12.37
LTC6952_2_REF_N: C42.2 U13.46
LTC6952_2_REF_P: C41.2 U13.45
LTC6952_2_REF_SMA_N: C42.1 J3.2 R75.1
LTC6952_2_REF_SMA_P: C41.1 J2.2 R75.2
LTC6952_2_Temp: R736.2 U13.49
LTC6952_3_REF_N: C44.2 U14.46
LTC6952_3_REF_P: C43.2 U14.45
LTC6952_3_REF_SMA_N: C44.1 J5.2 R76.1
LTC6952_3_REF_SMA_P: C43.1 J4.2 R76.2
LTC6952_3_Temp: R765.2 U14.49
MIO_0: R768.2 U1.H17
MIO_1: R769.2
MIO_2: R770.2
MIO_3: R771.2 U1.D19
MIO_4: R772.2 U1.J17
MIO_5: R773.2 U1.C19
MIO_6: R774.2 U1.D20
MIO_7: R775.2 U1.E19
MIO_8: R776.2 U1.E20
MIO_9: R777.2 U1.F20
MIO_10: R778.2 U1.F18
MIO_11: R779.2 U1.G18
MIO_12: R780.2 U1.H18
MIO_13: R87.1 U1.G19
MIO_14: R88.1 U1.E18
MIO_15: R89.1 U1.J19
MIO_16: R90.1 U1.K17
MIO_17: R91.1 U1.C18
MIO_18: R92.1 U1.K18
MIO_19: R93.1 U1.K16
MIO_20: R94.1 U1.A20
MIO_21: R95.1 U1.H19
MIO_22: R96.1 U1.F17
MIO_23: R781.2 U1.K19
MIO_24: R782.2 U1.A18
MIO_25: R783.2 U1.B18
MIO_26: R784.2 U1.B20
MIO_27: R785.2 U1.B21
MIO_28: R786.2 U1.A21
MIO_29: R787.2 U1.D21
MIO_30: R788.2 U1.C21
MIO_31: R789.2 U1.A22
MIO_32: R790.2 U1.G20
MIO_33: R791.2 U1.C22
MIO_34: R792.2 U1.B24
MIO_35: R793.2 U1.B23
MIO_36: R794.2 U1.D22
MIO_37: R795.2 U1.F21
MIO_38: R796.2 U1.C23
MIO_39: R101.1 U1.E22
MIO_40: R102.1 U1.C24
MIO_41: R103.1 U1.D24
MIO_42: R104.1 U1.E23
MIO_43: R797.2 U1.F22
MIO_44: R798.2 U1.E24
MIO_45: R799.2 U1.F23
MIO_46: R105.1 U1.K20
MIO_47: R107.1 U1.K21
MIO_48: R108.1 U1.J21
MIO_49: R110.1 U1.G21
MIO_50: R111.1 U1.J20
MIO_51: R112.1 U1.H21
MIO_52: R362.1 U1.A24
MIO_53: R800.2 U1.B25
MIO_54: R115.1 U1.A23
MIO_55: R801.2 U1.B26
MIO_56: R116.1 U1.A25
MIO_57: R117.1 U1.A26
MIO_58: R118.1 U1.A28
MIO_59: R119.1 U1.A27
MIO_60: R120.1 U1.C26
MIO_61: R121.1 U1.B29
MIO_62: R122.1 U1.B28
MIO_63: R802.2 U1.A29
MIO_64: R803.2 U1.B30
MIO_65: R804.2 U1.D25
MIO_66: R805.2 U1.C27
MIO_67: R806.2 U1.C28
MIO_68: R807.2 U1.C29
MIO_69: R808.2 U1.D27
MIO_70: R809.2 U1.D26
MIO_71: R810.2 U1.D30
MIO_72: R811.2 U1.E27
MIO_73: R812.2 U1.E30
MIO_74: R813.2 U1.E29
MIO_75: R814.2 U1.D29
MIO_76: R815.2 U1.E28
MIO_77: R816.2 U1.E25
MIO_GPIO_0_12: J15.2 R780.1
MIO_GPIO_0_23: J16.2 R98.1 R781.1
MIO_GPIO_1_38: J17.2 R796.1
MIO_GPIO_2_66: J19.2 R805.1
MIO_GPIO_2_70: J20.2 R809.1
MIO_GPIO_2_73: J22.2 R812.1
MIO_GPIO_2_74: J23.2 R813.1 U36_U_Translator_I2C2.8
MIO_GPIO_2_75: J24.2 R814.1 U36_U_Translator_I2C3.8
MODE: R669.2 R670.1 U65.2 | length 2.9
  L1 w0.254: R669.2@48.076,81.536 48.076,81.586 48.576,82.086 R670.1@49.059,82.086 49.059,82.036 49.232,81.863 49.282,81.863 49.438,81.707 U65.2@50.492,81.707
NetBT1_2: BT1.2 R650.1 T22.2
NetC36_1: C36.1 R52.2 R54.2
NetC45_2: C45.2 R77.1
NetC78_2: C78.2 U16.7
NetC79_2: C79.2 U16.38
NetC80_2: C80.2 U16.48
NetC91_1: C91.1 U16.39
NetC96_1: C96.1 U16.47
NetC207_2: C207.2 C208.1 J33.15 L3.2
NetC209_2: C209.2 C210.1 J33.20 L4.2
NetC211_2: C211.2 C212.1 J34.15 L5.2
NetC213_2: C213.2 C214.1 J34.20 L6.2
NetC215_2: C215.2 C216.1 J35.15 L7.2
NetC217_2: C217.2 C218.1 J35.20 L8.2
NetC277_2: C277.2
NetC278_2: C278.2
NetC289_2: C289.2
NetC290_2: C290.2
NetC301_2: C301.2
NetC302_2: C302.2
NetC320_1: C320.1 U30.9
NetC321_1: C321.1 U30.10
NetC322_2: C322.2 U30.3 X3.1
NetC323_2: C323.2 U30.2 X3.2
NetC334_1: C334.1 X1.10
NetC335_2: C335.2 R532.1 R533.2
NetC341_1: C341.1 J26.1
NetC351_2: C351.2 R268.2 U34.3 | length 4.2
  L1 w0.254: R268.2@120.402,37.776 120.402,39.054 120.551,39.203 121.325,39.203 C351.2@121.352,39.23 121.352,39.235 121.977,39.86 U34.3@121.977,40.906
NetC356_2: C356.2 R272.2 R277.1 R278.1 U34.2 U34.4 U34.7 U34.9 U34.32 | length 25
  L1 w0.254: R278.1@116.439,42.574 116.579,42.434 116.579,41.843 118.253,40.17 120.588,40.17 v1@120.627,40.209 ; U34.32@120.477,41.406 120.413,41.406 120.411,41.404 120.411,40.426 v1@120.627,40.209 ; U34.2@121.477,40.906 121.477,40.565 121.054,40.142 120.695,40.142 v1@120.627,40.209 ; U34.4@122.477,40.906 122.477,39.778 122.451,39.751 122.451,38.369 122.626,38.194 122.931,38.194 R272.2@122.978,38.24 122.978,38.29 123.251,38.563 123.372,38.563 123.676,38.867 124.134,38.867 124.277,39.01 C356.2@124.277,39.015 124.277,39.673 124.679,40.075 v1(124.679,40.094) 124.679,40.133 124.977,40.432 U34.9@124.977,41.406
  L16 w0.254: v1(120.627,40.17) 120.667,40.17 120.743,40.094 v1(124.679,40.094) 126.443,40.094 v1(128.799,42.449)
NetC357_2: C357.2 U34.13 U34.28 | length 10.4
  L1 w0.254: v1(119.896,43.406) U34.28@120.477,43.406 ; U34.13@124.977,43.406 124.979,43.404 125.128,43.404 125.132,43.399 126.383,43.399 126.881,42.9 126.881,42.667 v1(126.953,42.596)
  L16 w0.254: v1(119.896,43.406) 120.269,43.033 126.516,43.033 v1(126.953,42.596)
NetC471_2: C471.2 T21.12
NetC472_2: C472.2 T21.6
NetC473_2: C473.2 T21.1
NetC474_2: C474.2 T21.7
NetC475_2: C475.2 T21.S1
NetC476_2: C476.2 T21.S2
NetC532_1: C532.1 U44.14
NetC533_1: C533.1 U44.15
NetC534_1: C534.1 U44.16
NetC537_1: C537.1 FB26.2
NetC537_4: C537.4 FB27.2
NetC537_Z1: C537.Z1 FB28.1
NetC549_2: C549.2 R687.1 | length 1.1
  L1 w0.254: C549.2@160.268,37.01 160.271,37.013 161.326,37.013 R687.1@161.328,37.015
NetC558_Z1: C558.Z1 C558.Z2 C672.2
NetC568_2: C568.2 FB33.1 R433.2 U60.10 U60.11 U60.12 U60.13 U60.14
NetC571_1: C571.1 U60.7 | length 1.1
  L1 w0.254: U60.7@290.365,197.356 290.365,197.206 290.59,196.981 C571.1@290.59,196.303
NetC573_1: C573.1 R436.1 R437.2 U61.16 | length 4.2
  L1 w0.254: R436.1@231.886,135.975 232.331,135.975 232.48,136.124 232.48,136.153 232.713,136.385 232.834,136.385 233.007,136.558 R437.2@233.007,136.608 ; C573.1@231.92,136.949 231.92,136.939 232.251,136.608 R437.2@233.007,136.608 ; U61.16@233.192,138.03 233.192,137.745 233.007,137.561 R437.2@233.007,136.608
NetC577_1: C577.1 R438.1 R439.2 U61.10 | length 3.8
  L1 w0.254: R438.1@230.837,142.714 230.837,142.764 231.445,143.372 C577.1@232.192,143.372 232.808,143.372 232.981,143.199 R439.2@232.981,143.172 232.981,142.476 233.192,142.265 U61.10@233.192,141.98
NetC578_2: C578.2 U61.7 | length 1.3
  L1 w0.254: C578.2@234.68,143.268 234.686,143.262 234.686,141.986 U61.7@234.692,141.98
NetC579_2: C579.2 U61.19 | length 1.3
  L1 w0.254: C579.2@234.692,136.764 U61.19@234.692,138.03
NetC581_2: C581.2 C582.2 C583.2 FB34.2 R442.2 U62.1 U62.2 U62.3
NetC584_2: C584.2 R445.2 U62.7 | length 2.2
  L1 w0.254: U62.7@423.755,341.342 425.308,341.342 C584.2@425.358,341.292 C584.2@425.781,340.869
NetC588_1: C588.1 R543.2
NetC588_2: C588.2 C589.1 R545.2
NetC591_2: C591.2 C592.2 FB37.2 X9.4
NetC597_2: C597.2 R140.1 U65.17 | length 4.4
  L1 w0.254: U65.17@52.832,83.047 52.855,83.07 52.855,83.685 54.121,84.951 C597.2@55.15,84.951 55.138,84.939 55.138,84.038 R140.1@55.125,84.026 R140.1@55.116,84.035
NetC603_1: C603.1 R113.1 R114.2 U19.20
NetC604_1: C604.1 U19.25 | length 4.4
  L1 w0.254: U19.25@243.224,251.458 243.226,251.46 243.226,251.928 243.727,252.428 244.352,252.428 244.749,252.825 244.749,253.571 245.366,254.188 245.366,254.373 245.509,254.516 C604.1@245.514,254.516
NetC605_1: C605.1 R212.1 R214.2 U19.21
NetC612_1: C612.1 R216.2 R218.2 U19.22
NetC616_1: C616.1 R220.1 R274.2 U19.19
NetC633_2: C633.2 R613.1 | length 2.3
  L1 w0.254: R613.1@110.833,68.85 C633.2@110.833,71.136
NetC634_2: C634.2 R615.2 U34.11 U34.30 | length 14.8
  L1 w0.254: v1(119.401,42.381) 119.424,42.404 120.475,42.404 U34.30@120.477,42.406 ; U34.11@124.977,42.406 124.979,42.404 125.128,42.404 125.132,42.399 125.627,42.399 126.423,41.603 v1(126.423,39.14)
  L16 w0.254: v1(119.401,42.381) 119.401,40.619 120.411,39.609 121.982,39.609 122.114,39.476 122.114,39.385 122.387,39.112 C634.2@122.392,39.112 122.407,39.126 123.363,39.126 R615.2@123.378,39.14 v1(126.423,39.14)
NetC635_2: C635.2 R615.1 | length 1
  L16 w0.254: C635.2@122.392,38.147 122.439,38.194 123.331,38.194 R615.1@123.378,38.24
NetC636_2: C636.2 R616.1 | length 2.2
  L1 w0.254: R616.1@134.085,68.801 C636.2@134.085,71.026
NetC637_2: C637.2 R288.1
NetC638_2: C638.2 R298.1
NetC643_2: C643.2 R623.1 | length 1.1
  L1 w0.254: R623.1@218.105,40.305 C643.2@219.162,40.305
NetC644_2: C644.2 R624.1 | length 1
  L1 w0.254: C644.2@207.935,40.359 R624.1@208.901,40.359
NetC645_2: C645.2 R306.1
NetC646_2: C646.2 R316.1
NetC652_2: C652.2 R631.1 | length 1
  L1 w0.254: R631.1@170.674,37 170.679,37.005 171.661,37.005 C652.2@171.666,37.01
NetC655_1: C655.1 U49.6 | length 1.2
  L1 w0.254: U49.6@185.559,132.309 185.589,132.34 186.691,132.34 C655.1@186.721,132.37
NetC656_1: C656.1 U50.6 | length 1.7
  L1 w0.254: U50.6@185.559,127.46 186.791,127.46 186.968,127.283 186.973,127.283 187.116,127.14 C656.1@187.116,127.135